# Altium PCB NC_PCB_4L.PcbDoc (part 2 of 2)
Units mm, origin at the board's own origin, x right, y up, seen from the top; angles counter-clockwise.
Board outline 25 x 37 mm, 4 copper layers (Top, GND, PWR, Bottom), stack 1.591 mm thick; 63 components, 32 nets, 228 pads, 73 vias.
Unrouted connection lines stored in the file: 49.
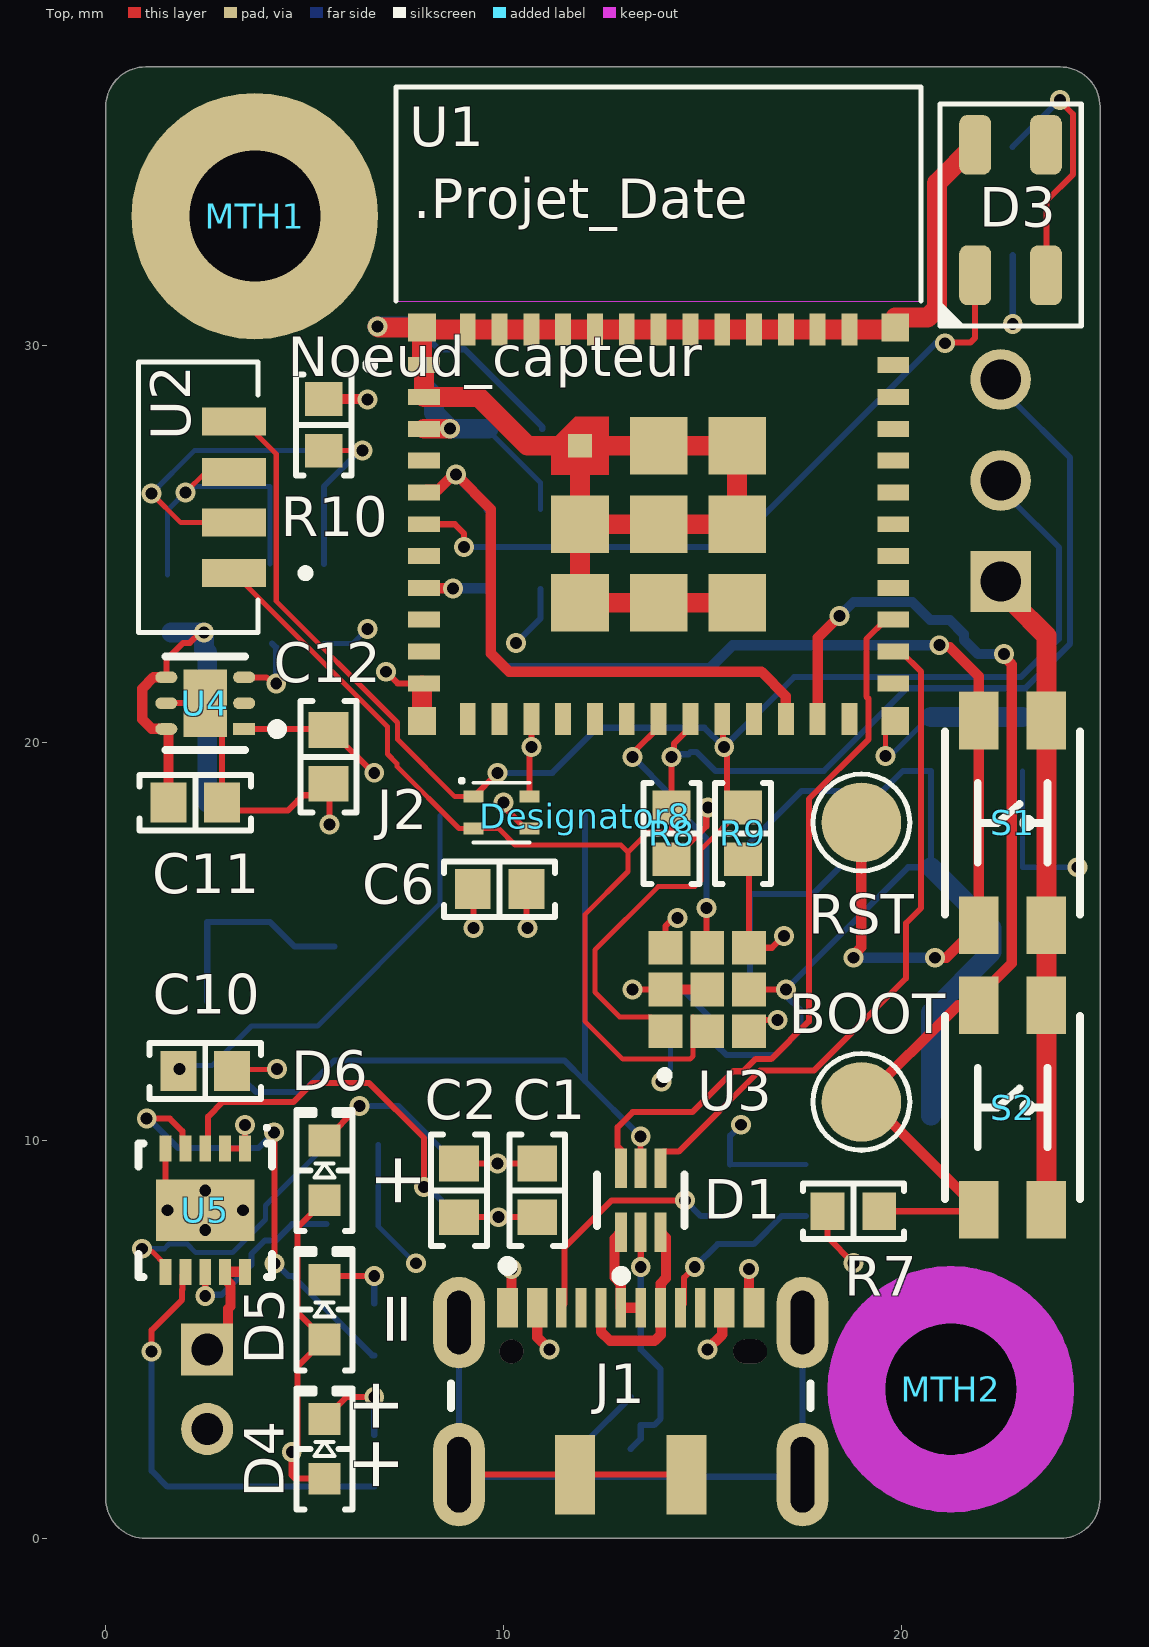
[diagram p0: Top view]

## Via types
v1: diameter 0.5, hole 0.3, Top to Bottom, tented both sides, 69 vias
v2: diameter 0.5, hole 0.3, Top to Bottom, tented top, 4 vias

## Nets (pads, with @x,y where several pads share a name; then routed paths per layer and width w, separated by ;. In a path a pad name is that pad's centre, name@x,y a point inside that pad or via, vN(x,y) a via of type N, cw(c..) or ccw(c..) an arc to the next point about the centre after c; other vN are vias at no path point) (continued)
NetR7_2: BOOT.1 R7.2 S2.3 S2.4 U1.23 | length 27.5
  Top w0.152: R7.2 21.916,8.225 S2.4
  Top w0.26: U1.23 17.9,22.644 v1(18.45,23.194) ; S2.4 19.234,10.975 BOOT.1 21.434,13.409 S2.3 21.95,13.634 22.78,14.464 22.78,21.975 22.584,22.171 v1(22.584,22.236)
  Bottom w0.26: v1(18.45,23.194) 18.801,23.545 20.276,23.545 20.729,23.092 21.221,23.092 21.578,22.735 21.578,22.592 21.935,22.236 v1(22.584,22.236)
NetR11_2: R11.2 U4.3 | length 1.9
  Top w0.152: U4.3 4.041,21.65 4.191,21.5 v1(4.285,21.5)
  Bottom w0.152: R11.2 4.285,22.398 v1(4.285,21.5)
NetR12_1: R12.1 U5.6 | length 7.1
  Top w0.127: v1(0.907,7.282) 0.978,7.211 1.164,7.211 1.5,6.875 U5.6
  Bottom w0.127: v1(0.907,7.282) 1.47,7.282 1.586,7.399 2.049,7.399 2.265,7.182 3.185,7.182 4.017,8.015 4.017,8.367 R12.1
NetR13_1: R13.1 U5.3 | length 9.6
  Top w0.152: U5.3 2.574,9.874 2.574,10.602 2.945,10.974 4.721,10.974 5.202,11.455 6.615,11.455 8.002,10.069 8.002,8.913 7.964,8.875 v1(8.002,8.837)
  Bottom w0.152: v1(8.002,8.837) 8.093,8.837 8.83,8.1 R13.1
NetR14_1: R14.1 U5.4 | length 11.9
  Top w0.152: v1(1.028,10.554) 1.612,10.554 1.926,10.239 1.926,9.874 U5.4 ; v1(4.231,10.21) 4.238,10.204 4.238,6.92 v1(4.244,6.914)
  Bottom w0.152: v1(1.028,10.554) 1.079,10.554 1.82,9.813 3.835,9.813 v1(4.231,10.21) ; v1(4.244,6.914) 4.278,6.914 4.599,6.593 4.707,6.593 6.7,4.6 R14.1
NetR15_2: R15.2 U5.8 | length 4.6
  Top w0.152: v1(2.5,6.093) U5.8
  Bottom w0.152: v1(2.5,6.093) 2.532,6.125 2.913,6.125 3.663,6.875 3.663,7.155 4.003,7.494 4.282,7.494 4.688,7.9 R15.2
NetR16_1: R16.1 U5.7 | length 11.1
  Top w0.152: v1(1.15,4.7) 1.15,5.232 1.92,6.002 1.92,6.254 1.926,6.261 1.926,6.339 1.926,6.626 U5.7
  Bottom w0.152: v1(1.15,4.7) 1.15,1.7 1.55,1.3 R16.1
NetR17_2: R17.2 R18.1 U6.1 | length 4.6
  Bottom w0.152: R18.1 R17.2 17.775,16.2 U6.1
VBAT: C10.2 IC1.2 J4.1 U5.9 U5.10 VBAT.1 | length 13.7
  Top w0.152: C10.2 1.85,11.775 v1(1.85,11.8)
  Top w0.26: J4.1 3.074,5.274 3.074,5.77 3.134,5.83 3.134,6.391 3,6.525 U5.9 U5.10
  Bottom w0.127: IC1.2 1.6,11.55 1.937,11.886 2.664,11.886 3.661,12.883 5.326,12.883 8.4,15.957 VBAT.1
VBUS: C1.2 C2.2 D1.5 D2.1 D4.1 D5.1 D6.1 IC1.1 J1.A4/B9 J1.B4/A9 R4.2 U5.1 U5.2 VBUS.1 | length 33.4
  Top w0.152: U5.2 U5.1 v1(3.5,10.394) ; v1(4.675,2.174) 4.675,1.589 4.764,1.5 D4.1 ; v1@4.824,2.176 4.824,4.324 D5.1 4.824,5.676 4.824,7.824 D6.1 ; C2.2 v1(9.877,8.075) C1.2 ; D1.5 v1(13.45,10.1)
  Top w0.26: J1.A4/B9 10.85,5.059 v1(11.159,4.75) ; v1(15.125,4.75) 15.5,5.125 15.5,5.75 J1.B4/A9
  Bottom w0.152: IC1.1 3.78,11.22 4.95,11.22 D2.1 11.53,12.02 12.05,11.5 ; VBUS.1 12.05,11.5 ; R4.2 v1(13.45,10.1) 12.05,11.5
pads on no net: D3.1 J1. J1.A8 J1.B8 MTH2.1 U1.4 U1.7 U1.9 U1.10 U1.12 U1.13 U1.15 U1.16 U1.17 U1.21 U1.24 U1.25 U1.28 U1.29 U1.30 U1.31 U1.32 U1.33 U1.34 U1.35 U4.2

## Polygon pours and split planes (outlines as drawn)
GND on GND (split plane): 24.096,36.482 24.188,36.454 24.273,36.409 24.348,36.348 24.409,36.273 24.454,36.188 24.482,36.096 24.491,36.012 24.49,36 24.49,1 24.491,0.988 24.482,0.904 24.454,0.812 24.409,0.727 24.348,0.652 24.273,0.591 24.188,0.546 24.096,0.518 24.012,0.509 24,0.51 1,0.51 0.988,0.509 0.904,0.518 0.812,0.546 0.727,0.591 0.652,0.652 0.591,0.727 0.546,0.812 0.518,0.904 0.509,0.988 0.51,1 0.51,36 0.509,36.012 0.518,36.096 0.546,36.188 0.591,36.273 0.652,36.348 0.727,36.409 0.812,36.454 0.904,36.482 0.988,36.491 1,36.49 24,36.49 24.012,36.491
VBAT on PWR (split plane): 2.32,9.375 2.324,9.355 2.33,9.325 2.358,9.283 2.983,8.658 3.017,8.636 3.025,8.63 3.055,8.624 3.075,8.62 3.571,8.62 4.046,8.146 4.046,0.51 1,0.51 0.988,0.509 0.904,0.518 0.812,0.546 0.727,0.591 0.652,0.652 0.591,0.727 0.546,0.812 0.518,0.904 0.509,0.988 0.51,1 0.51,12.471 2.32,12.471
LOAD on PWR (split plane): 24.096,36.482 24.188,36.454 24.273,36.409 24.348,36.348 24.409,36.273 24.454,36.188 24.482,36.096 24.491,36.012 24.49,36 24.49,33.755 7.5,33.755 7.45,33.745 7.408,33.717 2.908,29.217 2.88,29.175 2.871,29.125 2.871,22.125 2.88,22.075 2.908,22.033 4.121,20.821 4.121,17.129 0.51,17.129 0.51,36 0.509,36.012 0.518,36.096 0.546,36.188 0.591,36.273 0.652,36.348 0.727,36.409 0.812,36.454 0.904,36.482 0.988,36.491 1,36.49 24,36.49 24.012,36.491
3V3 on PWR (split plane): 24.49,1 24.491,0.988 24.482,0.904 24.454,0.812 24.409,0.727 24.348,0.652 24.273,0.591 24.188,0.546 24.096,0.518 24.012,0.509 24,0.51 19.33,0.51 19.33,6.175 19.32,6.225 19.292,6.267 19.25,6.295 19.2,6.304 18.904,6.304 17.942,7.267 17.9,7.295 17.85,7.304 15.304,7.304 14.904,7.704 14.904,10.025 14.895,10.075 14.867,10.117 14.017,10.967 13.975,10.995 13.925,11.004 8.654,11.004 8.092,11.567 6.729,12.929 6.729,13.821 7.142,14.233 7.17,14.275 7.18,14.325 7.18,15.7 7.17,15.75 7.142,15.792 5.842,17.092 5.8,17.12 5.75,17.129 4.38,17.129 4.38,20.875 4.37,20.925 4.342,20.967 3.129,22.179 3.129,29.071 7.554,33.496 24.49,33.496
NetD2_2 on PWR (split plane): 6.921,15.646 6.921,14.379 6.508,13.967 6.48,13.925 6.471,13.875 6.471,13.029 4.25,13.029 4.23,13.026 4.2,13.02 4.19,13.013 4.158,12.992 3.896,12.73 0.51,12.73 0.51,16.871 5.696,16.871
VBUS on PWR (split plane): 7.908,11.383 8.508,10.783 8.55,10.755 8.6,10.746 13.871,10.746 14.645,9.971 14.645,7.65 14.655,7.6 14.683,7.558 15.158,7.083 15.2,7.055 15.25,7.045 17.796,7.045 18.758,6.083 18.8,6.055 18.85,6.045 19.071,6.045 19.071,0.51 4.304,0.51 4.304,8.2 4.295,8.25 4.267,8.292 3.717,8.842 3.675,8.87 3.625,8.879 3.129,8.879 2.579,9.429 2.579,12.471 3.95,12.471 3.97,12.474 4,12.48 4.016,12.492 4.042,12.508 4.304,12.771 6.521,12.771

## Other copper
PWR (plane layer: these items are gaps in the copper):
  lines w0.254: -0.425,12.6 2.95,12.6 3.95,12.6 4.25,12.9 4.625,12.9 6.575,12.9 8,11.475 8.6,10.875 13.925,10.875 14.775,10.025 14.775,7.65 15.25,7.175 17.85,7.175 18.85,6.175 19.2,6.175 19.2,-1.075 ; -0.425,17 5.75,17 7.05,15.7 7.05,14.325 6.6,13.875 6.6,12.875 ; 2.45,12.6 2.45,9.375 3.075,8.75 3.625,8.75 4.175,8.2 4.175,-0.15 ; 4.25,17 4.25,20.875 3,22.125 3,29.125 7.5,33.625 25,33.625

## Silkscreen, mask and mechanical layers (free items; w line width, h text height)
Top Overlay:
  text ".Projet_Concepteur3" at -5.05,74.15 h1
  text ".Projet_Date" at 7.725,33.2 h1
  text "Noeud_capteur" at 4.573,29.217 h1
  text "+" at 6.373,9.734 h2.2 r270
  text "=" at 6.35,6.256 h2.2 r270
  text "++" at 7.777,1.117 h2.2 r90
Bottom Overlay:
  text "Conçu par:" at 19.14,34.039 h1
  text "William.C" at 18.538,33.954 h1
  text "Bruno.S" at 17.991,32.671 h1
  text "SCL" at 20.5,28.568 h1.7
  text "SDA" at 20.5,26.018 h1.7
  text "GND" at 20.5,23.36 h1.7
Board Outline:
  the board outline again, w0.254

## Text inside footprints (layer, text, board x,y; h text height)
Designator8: Top Paste "PCB Revision" at -86.67,135.07 h2; Top Paste "ENGRAVE ALL TEXT" at -89.39,-153.026 h6.5; Top Paste "STENCIL THICKNESS -" at -67.578,-166.911 h6.5; Top Paste "TOP" at 69.081,-111.575 h4
REV1: Bottom Overlay "PCB REV #" at 16.922,30.646 h1
SER1: Bottom Overlay "SERIAL #" at 12.162,15.489 h1